# Altium PCB BLE_product-v1.0(Updated Power Jack).PcbDoc (part 2 of 2)
Units mil, origin at the board's own origin, x right, y up, seen from the top; angles counter-clockwise.
Board outline 472.44 x 507.34 mil, 4 copper layers (Top Layer, Layer 2, Layer 3, Bottom Layer), stack 39.334 mil thick; 45 components, 33 nets, 183 pads, 87 vias.
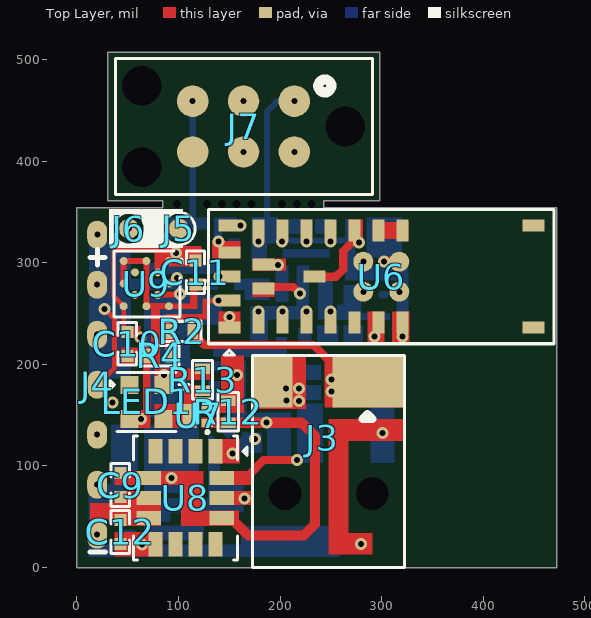
[diagram p0: Top Layer view]

## Polygon pours and split planes (outlines as drawn) (continued)
3V on Layer 2 "3V_L02_P015" (solid, pour order 15): 60.71,134.27 61.07,133.91 127.63,133.91 127.63,7.53 127.04,6.93 126,7.97 55.53,7.97 55.53,129.27 60.53,134.27

## Other copper
Top Layer:
  rectangle net 3V: 36.79,10.96 84.08,34.98
  rectangle net GND: 110.76,272.86 125.67,284.67
  rectangle net 3V: 314.32,220.85 327.29,251.83
  rectangle net NetC8_2: 286.25,220.85 302.61,251.79
  rectangle net GND: 267.1,316.2 281.53,342.34
  rectangle net LED_DATA: 172.61,266.29 194.26,280.33
  rectangle net GND: 139.14,230.13 160.8,252.17
  rectangle net 3V: 36.79,81.42 106.28,95.21
  rectangle net LED_DATA: 141.69,152.27 164.25,208.46
  rectangle net HV_LED_DATA: 105.41,168.69 130.95,179.32
  rectangle net GND: 267.1,320.69 281.53,342.34
  rectangle net GND: 172.87,155.83 225.34,208.58
  rectangle net RST: 133.21,303.94 160.86,321.41
  rectangle net 3V: 79.97,296.45 122.65,316.22
  rectangle net GND: 111.38,254.64 118.69,275.8
  rectangle net POWER_DET: 123.41,259.61 139.14,264.61
  rectangle net POWER_DET: 123.41,243.91 129.67,263.64
  rectangle net POWER_DET: 87.07,244 125.66,249.31
  rectangle net GND: 72.81,200.55 81.59,259.75
  rectangle net 3V: 33.92,272.37 38.42,316.24
  rectangle net 3V: 34.02,309.89 83.09,316.24
  rectangle net 3V: 310.28,220.85 326.23,251.83
  rectangle net NetC8_2: 290.7,220.85 302.61,251.83
  rectangle net 3V: 43.75,226.1 62.66,237.91
  rectangle net CLR_POWER: 172.61,291.65 205.78,303.95
  rectangle net GND: 36.79,40.88 82.89,75.53
  rectangle net 5V_USB: 243.47,157.4 322.7,208.58
  rectangle net POWER_DET: 87.06,202.09 97.69,249.4
  rectangle net GND: 64.9,137.32 72.33,209.37
  rectangle net GND: 43.75,200.65 76.04,216.65
  rectangle net 5V: 76.58,170.78 94.29,195.65
  rectangle net 5V: 76.58,184.56 130.95,195.7
  rectangle net GND: 134.35,102.3 160.76,126.37
  rectangle net GND: 43.11,137.32 68.7,155.03
  rectangle net HV_LED_DATA: 76.58,137.32 117.69,161.13
  rectangle net HV_LED_DATA: 105.41,137.5 117.91,179.32
  rectangle net LED_DATA: 122.8,152.27 164.25,162.9
  rectangle net 3V: 122.8,137.17 164.25,147.8
  rectangle net 3V: 102.61,40.88 124.48,95.21
  rectangle net GND: 13.04,47.48 82.89,63.38
  rectangle net GND: 13.04,32.27 26.66,54.14
  rectangle net 3V: 107.76,40.88 159.55,56.14
  rectangle net GND: 41.79,40.88 53.6,75.14
  rectangle net NetU6_11: 290.72,323.27 326.15,339.87
  rectangle net SCL: 135.53,61.75 172.61,75.53
  rectangle net SDA: 135.53,81.43 172.61,95.21
  rectangle net VBAT: 247.75,124.32 322.27,146.17
  rectangle net VBAT: 247.75,18.7 267.1,146.17
  rectangle net VBAT: 247.75,12.8 290.72,34.16
Layer 2:
  rectangle net GND: 307.34,18.92 320.67,50.26
Layer 3:
  rectangle net VBAT: 273.45,16.89 285.6,30.5
Bottom Layer:
  rectangle net GND: 256.22,243.53 308.36,250.45
  rectangle net GND: 187.11,102.76 210.92,152.55
  rectangle net CLR_POWER: 165.07,263.31 189.37,284.65
  rectangle net 3V: 172.09,295 187.17,344.93
  rectangle net 3V: 172.09,320.11 197.8,344.93
  rectangle net VBAT: 33.69,45.32 60.11,141
  rectangle net VBAT: 11.37,45.42 36.54,81.48
  rectangle net NetC8_2: 262.63,220.24 281.53,238.6
  rectangle net 5V_USB: 172.61,156.2 242.43,161.2
  rectangle net 5V_USB: 172.61,156.2 185.24,198.9
  rectangle net GND: 285.03,305.36 320.03,344.45
  rectangle net GND: 14.13,10.43 25.89,32.27
  rectangle net NetL1_1: 102.18,26.43 125.24,48.05
  rectangle net NetL1_1: 66.28,26.43 125.24,41.12
  rectangle net NetQ1_3: 170.51,244.19 228.54,257.28
  rectangle net VBAT: 134.99,314.06 142.83,344.55
  rectangle net VBAT: 142.83,332.74 157.92,344.55
  rectangle net GND: 79.42,332.74 129.02,344.43
  rectangle net NetR3_1: 192.45,164.89 240.45,179.84
  rectangle net 3V: 263.81,282.52 326.15,297.43
  rectangle net 3V: 263.81,287.45 274.44,342.93
  rectangle net 3V: 184.42,318.69 274.44,324.69
  rectangle net SDA: 234.3,328.36 252.79,342.93
  region net SCL: 228.31,342.93 208.83,342.93 208.83,328.36 228.31,328.36
  rectangle net 3V: 314.34,227.13 326.15,287.45
  rectangle net GND: 236.21,218.97 257.53,238.83
  rectangle net GND: 256.22,243.6 280.03,259
  rectangle net NetC8_2: 262.63,226.5 274.44,238.6
  rectangle net GND: 11.54,10.43 183.24,22.51
  rectangle net VBAT: 289.07,102.76 312.69,160.15
  rectangle net GND: 154.18,138.43 202.14,152.55
  region net GND: 135.83,139.79 149.13,126.48 169.83,147.18 156.53,160.49
  rectangle net GND: 104.67,193.62 166.48,203.23
  rectangle net GND: 154.61,159.44 166.48,200.69
  rectangle net GND: 65.87,147.58 111.13,268.29
  rectangle net GND: 79.97,238.91 142.95,268.2
  rectangle net BAT_STAT: 217.58,218.81 231.07,236.38
  rectangle net GND: 262.63,256.32 280.03,278
  rectangle net BAT_ADC: 237.21,243.92 251.85,268.42
  rectangle net GND: 161.66,10.43 259.13,40.93
  rectangle net GND: 111.13,238.93 143.01,268.2
  rectangle net NetL1_1: 71.29,29.67 87.04,38.26
  rectangle net 5V: 74.32,53.93 164.01,68.31
  rectangle net 5V: 66.28,45.42 92.05,68.31
  rectangle net 5V: 71.29,45.42 87.04,54.01
  rectangle net NetQ1_1: 195.92,207.41 206.55,227.09
  rectangle net NetQ1_3: 216.31,252.21 228.54,268.42
  rectangle net NetQ1_3: 216.31,261.13 228.54,297.43
  rectangle net NetSW1_2: 34.68,273.15 138.88,284.17
  rectangle net VBAT: 195.7,261.13 208.51,297.43
  rectangle net 5V_USB: 216.82,102.76 242.43,160.15
  rectangle net NetL1_1: 66.28,73.28 120.32,141
  rectangle net NetR5_1: 196.26,184.33 240.45,199.52
  rectangle net BAT_ADC: 237.28,261.13 251.85,287.55
  rectangle net V_MON: 202.57,305.27 248.5,313.54
  rectangle net NetQ1_3: 170.51,223.16 188.23,257.28
  rectangle net NetQ1_1: 134.1,207.41 206.55,217.25
  rectangle net ENABLE: 149.12,310.16 160.14,323.82
  rectangle net CLR_POWER: 154.63,273.15 186.65,284.17
  rectangle net ENABLE: 162.54,112.79 182.32,132.74
  rectangle net 3V: 129.01,154.91 140.89,183.68
  rectangle net 5V: 129.01,87.81 140.89,121.25
  rectangle net 5V: 129.01,56.04 164.01,87.81
  rectangle net VBAT: 11.54,45.42 55.54,54.01
  rectangle net NetSW1_2: 11.79,186 53.13,319.87
  rectangle net GND: 68.87,288.9 138.88,299.92

## Silkscreen, mask and mechanical layers (free items; w line width, h text height)
Top Overlay:
  region: 99.59,352.7 104.36,352.7 104.36,350.05 103.75,349.45 103.59,349.61 99.1,349.61 99.1,350.23 ccw(c94.28,350.24) 98.63,352.31 cw(c99.59,351.36)
  region: 95.95,314.57 104.36,314.57 104.36,315.03 104.36,318.2 cw(c101.97,323.96) 99.58,318.2 95.78,318.2 95.78,318.54 cw(c95.77,325.8) 90.64,320.67 88.99,322.31 cw(c100.03,333.35) 84.42,333.35 84.42,333.51 cw(c96.02,333.51) 87.82,341.72 94.46,348.36 101.27,348.68 ccw(c93.74,349.8) 100.78,352.68 79.35,352.68 77.78,314.57 80.2,314.57
  region: 55.59,352.68 31.76,352.68 31.76,314.49 80.21,314.49 79.42,333.51 67.21,333.51 67.21,333.47 cw(c51.34,333.46) 62.55,322.23 62.52,322.2 cw(c51.21,333.49) 51.21,317.51 50.24,317.51 cw(c50.24,331.06) 40.66,321.48 36.56,325.58 35.13,339.04 ccw(c35.21,340.72) 36.9,340.67 40.12,343.89 ccw(c38.28,345.73) 37.66,348.26
  region: 80.04,352.68 cw(c54.32,343.92) 79.42,333.51 67.25,333.51 67.21,333.47 67.21,334.31 ccw(c53.23,334.32) 63.11,344.2 60.3,347.01 ccw(c58.47,345.18) 58.46,347.77 ccw(c59.72,349.3) 59.91,347.33 ccw(c50.15,327.81) 43.24,348.51 40.98,346.25 39.89,347.33 ccw(c37.67,345.12) 37.66,348.26 cw(c37.66,351.29) 35.52,349.14 31.98,352.68
  lines w3: 32.79,183.85 32.79,175.85 36.9,179.96 32.79,184.07 ; 100.41,180.32 110.41,180.32 ; 105.41,175.32 105.41,185.32 ; 167.55,110.21 163.44,114.33 167.55,118.44 167.55,110.44 ; 173,208.58 173,0 322.61,0 322.61,208.58 ; 144.95,209.05 150,214 154.95,209.05 144.95,209.05
  lines w5: 12.74,305.09 27.74,305.09 ; 13.04,15.43 28.04,15.43 ; 20.17,297.74 20.17,312.74
Bottom Overlay:
  lines w3: 185.38,33.97 195.38,33.97 ; 299.34,33.97 309.34,33.97 ; 304.34,28.97 304.34,38.97 ; 330.5,264.5 343.5,264.5 ; 337,258 337,271 ; 213.73,149.69 218.68,154.64 213.73,159.69 213.73,149.69
  text "BAT" at 274.39,43.02 h20
Dimensions:
  drawing of 295 lines, arcs and shapes, not listed
  text "Layer" at -1447.66,2075 h60
  text "Name" at -1037.74,2075 h60
  text "Material" at -108,2075 h60
  text "Thickness" at 751.77,2075 h60
  text "Constant" at 1401.6,2075 h60
  text "Board Layer Stack" at 1971.46,2075 h60
  text "Top Overlay" at -1037.74,1955 h60
  text "Top Solder" at -1037.74,1835 h60
  text "Solder Resist" at -108,1835 h60
  text "0.010mm" at 751.77,1835 h60
  text "3.5" at 1401.6,1835 h60
  text "1" at -1447.66,1715 h60
  text "Top Layer" at -1037.74,1715 h60
  text "0.035mm" at 751.77,1715 h60
  text "Dielectric 2" at -1037.74,1595 h60
  text "PP-017" at -108,1595 h60
  text "0.130mm" at 751.77,1595 h60
  text "4.3" at 1401.6,1595 h60
  text "2" at -1447.66,1475 h60
  text "Layer 2" at -1037.74,1475 h60
  text "CF-004" at -108,1475 h60
  text "0.035mm" at 751.77,1475 h60
  text "Dielectric 1" at -1037.74,1355 h60
  text "FR-4" at -108,1355 h60
  text "0.600mm" at 751.77,1355 h60
  text "4.8" at 1401.6,1355 h60
  text "3" at -1447.66,1235 h60
  text "Layer 3" at -1037.74,1235 h60
  text "CF-004" at -108,1235 h60
  text "0.035mm" at 751.77,1235 h60
  text "Dielectric 3" at -1037.74,1115 h60
  text "PP-017" at -108,1115 h60
  text "0.130mm" at 751.77,1115 h60
  text "4.3" at 1401.6,1115 h60
  text "4" at -1447.66,995 h60
  text "Bottom Layer" at -1037.74,995 h60
  text "0.035mm" at 751.77,995 h60
  text "Bottom Solder" at -1037.74,875 h60
  text "Solder Resist" at -108,875 h60
  text "0.010mm" at 751.77,875 h60
  text "3.5" at 1401.6,875 h60
  text "Bottom Overlay" at -1037.74,755 h60
  text "Total board thickness:" at -1447.66,635 h60
  text "1.019mm" at 751.77,635 h60
Board Outline:
  lines w3: 0,354.33 84.47,354.33 84.47,361 30.33,361 30.33,507.34 298.25,507.34 298.25,360.92 242.75,360.92 242.75,354.33 295.33,354.33 472.44,354.33 ; 0,354.33 0,0 472.44,0 ; 0,354.33 0,354.33 ; 472.44,0 472.44,354.33 ; 472.44,0 472.44,0 ; 472.44,354.33 472.44,354.33

## Dimensions
472.44,354.33 to 298.25,507.34 on Dimensions
472.44,0 to 332.61,-86.69 on Dimensions
322.61,0 to 298.25,507.34 on Dimensions
472.44,354.33 to 332.61,-86.69 on Dimensions
472.44,354.33 to 330.71,354.33 on Dimensions
0,354.33 to 0,0 on Dimensions
0,354.33 to 472.44,354.33 on Dimensions

## Text inside footprints (layer, text, board x,y; h text height)
SW1: Bottom Overlay "PCB EDGE" at 51.85,296.99 h15 r90